# Altium PCB PCB_基于STM32单片机婴儿床自动放音乐自动摇篮_2024-11-12.pcbdoc
Units mil, origin at the board's own origin, x right, y up, seen from the top; angles counter-clockwise.
Board outline 6900 x 6090 mil, 2 copper layers (Top Layer, Bottom Layer); 22 components, 34 nets, 140 pads, 2 vias.
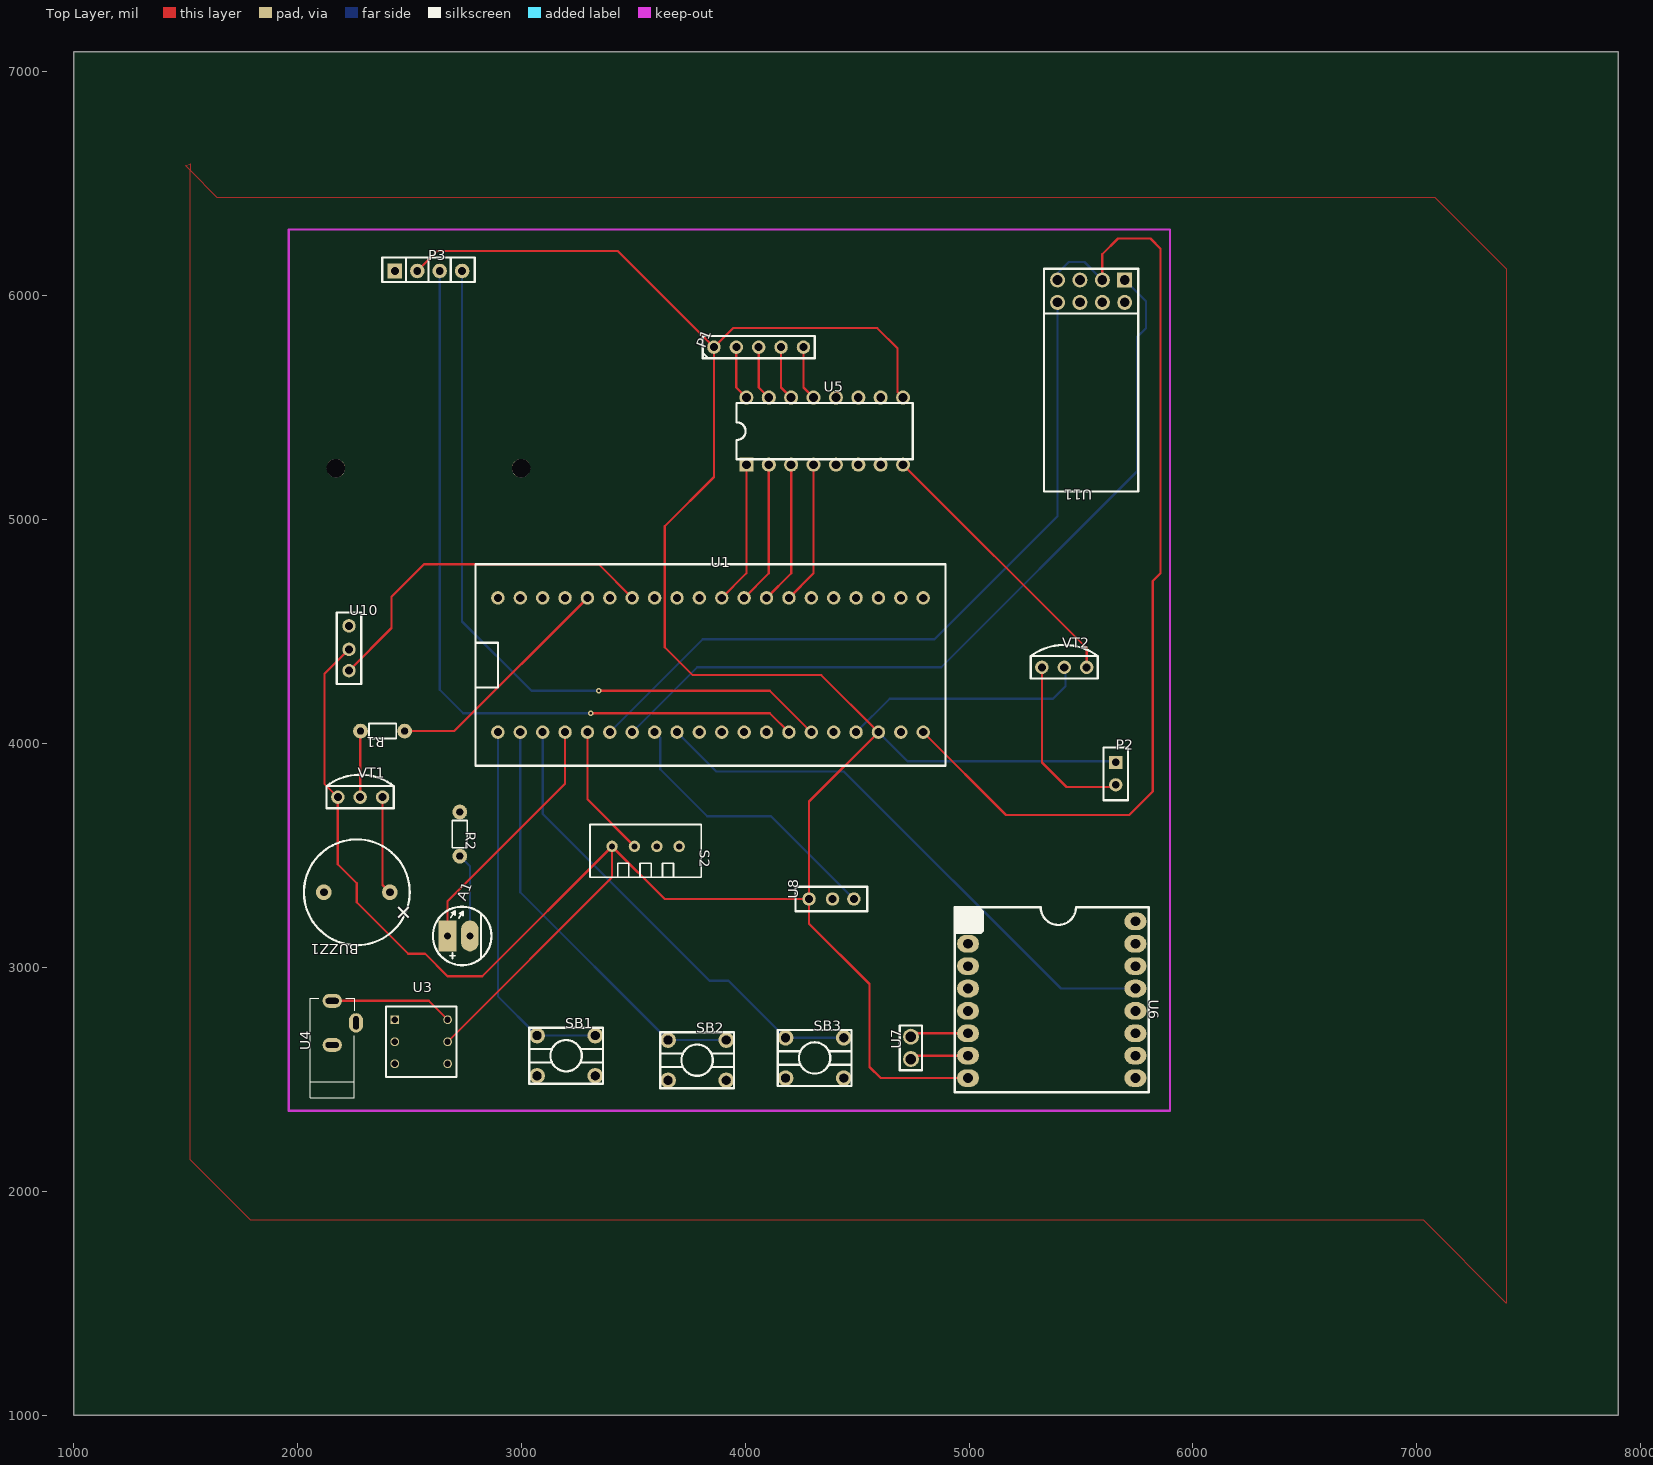
[diagram p0: Top Layer view]
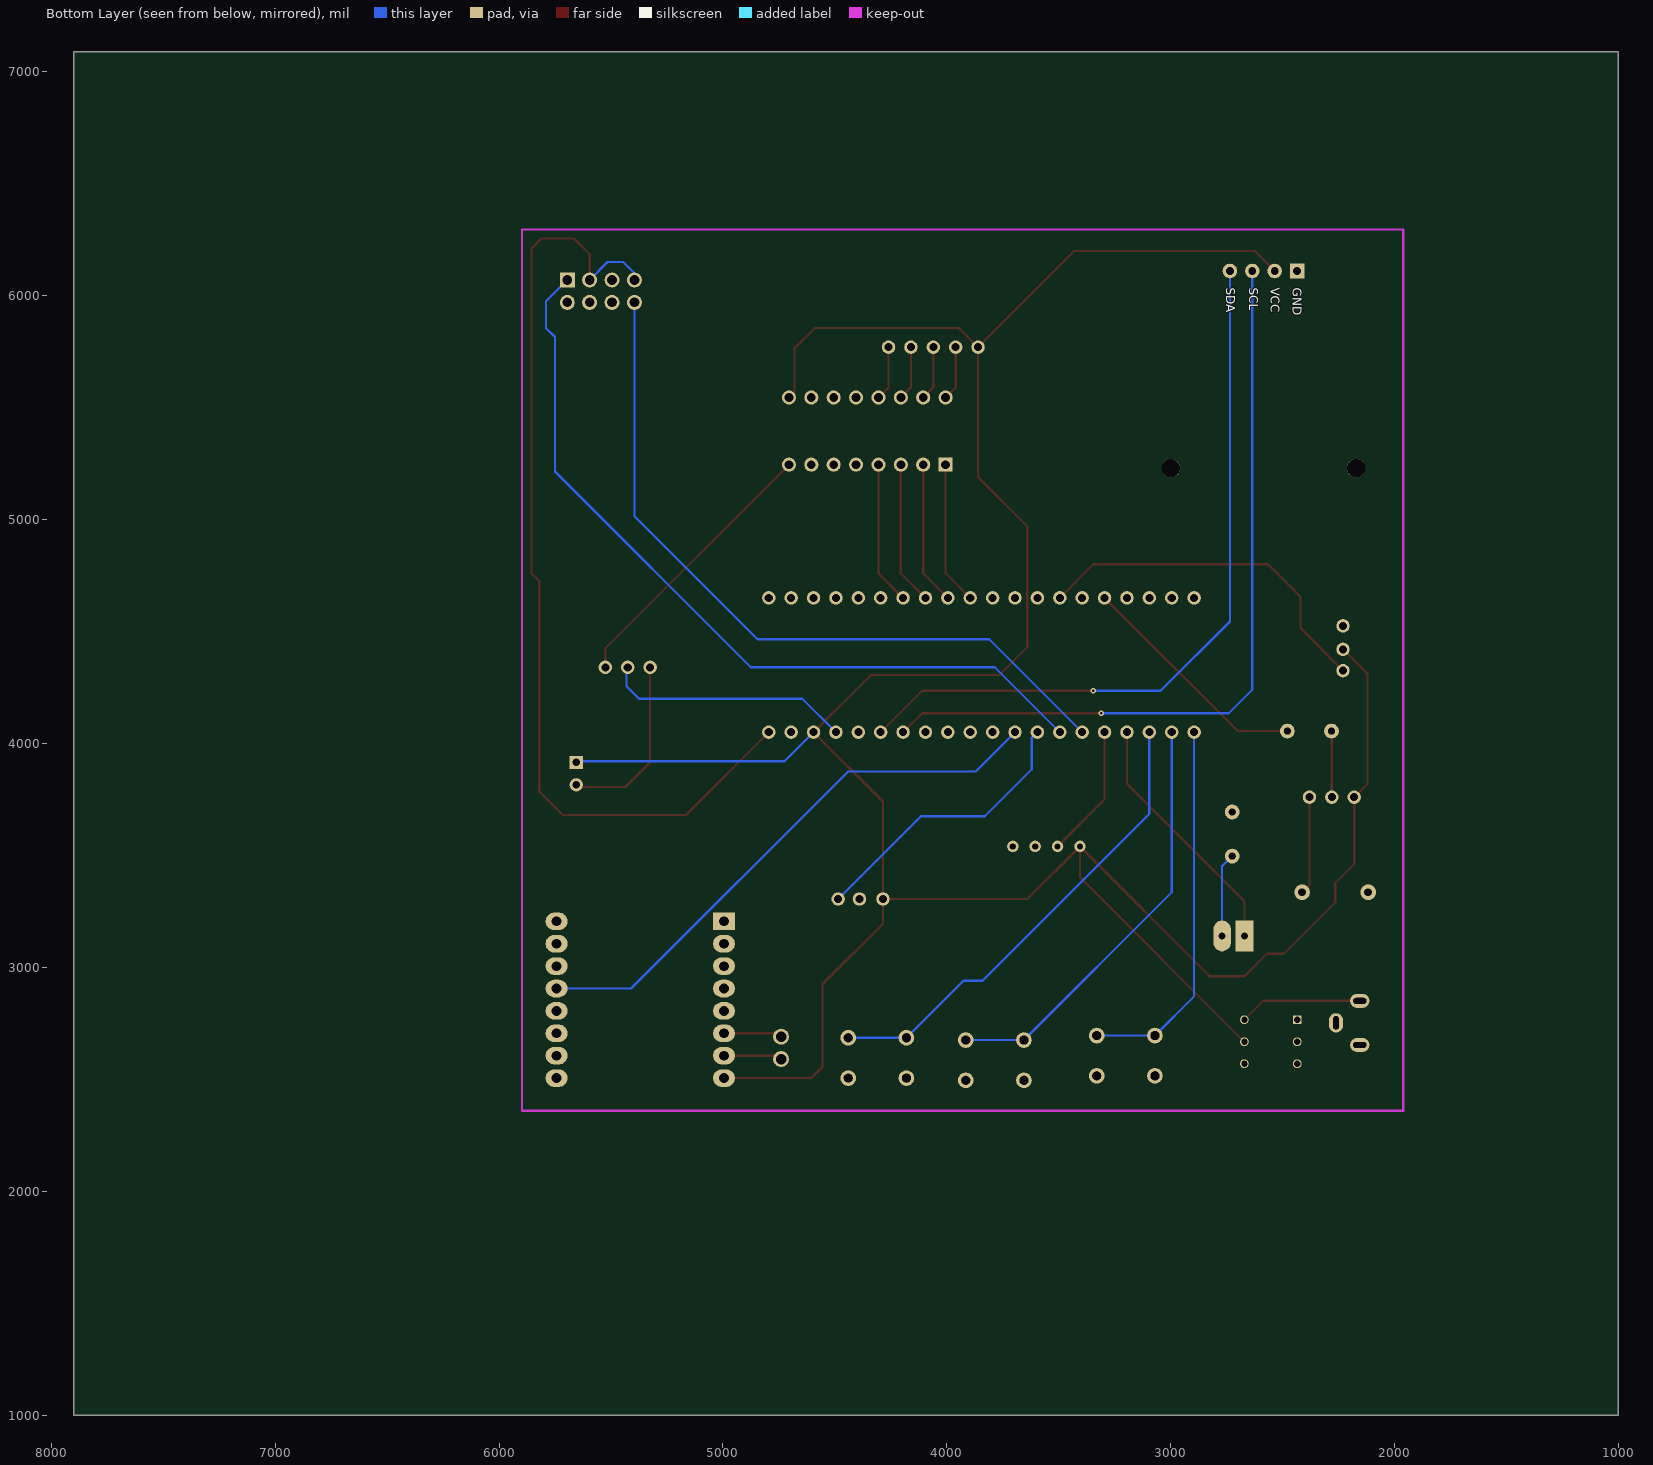
[diagram p1: Bottom Layer view, seen from below]

## Layer stack, top to bottom
Top Layer: signal copper (thickness not stored)
Dielectric: dielectric 12.6, FR-4, Dk 4.8
Bottom Layer: signal copper (thickness not stored)

## Board outline
7900,1000 1000,1000 1000,7090 7900,7090

## Components (designator, comment, footprint, x,y, rotation, side; value= is the part's Value field where it differs from the comment)
A1 "LED灯发光二极5mm" LED灯发光二极5MM 2670,3140 r0 top
BUZZ1 "蜂鸣器BD12.0-P7.50" BUZ-TH_BD12.0-P7.50-D0.6-FD 2265,3335 r180 top
P1 "PIN5" PIN5 4060,5770 r90 top
P2 "2P排针" 2P排针 5655,3915 r0 top
P3 "OLED0.96" 0.96OLED_4P 2585,6170 r0 top
R1 "1k" SPARKFUN-RESISTORS_1/6W-RES 2380,4055 r180 top
R2 "1k" SPARKFUN-RESISTORS_1/6W-RES 2725,3595 r270 top
S2 "DHT11" ? 3400,3545 r270 top
SB1 "按键" 按键 3005,2490 r0 top
SB2 "按键" 按键 3590,2470 r0 top
SB3 "按键" 按键 4115,2480 r0 top
U1 "STM32F103C8T6最小系统板原理图" STM32F103C8T6最小系统板PCB图 3495,4050 r0 top
U3 "自锁开关8*8" 自锁开关8*8 2395,2825 r0 top
U4 "DC3.5插座" DC插座3.5MM 2155,2850 r90 top
U5 "ULN2003N" DIP-16_L19.8-W6.5-P2.54-LS7.6-BL 4355,5395 r0 top
U6 "BY8001-16P" BY8001-16P 4995,3205 r270 top
U7 "排针2" 排针2P 4740,2640 r90 top
U8 "3P排针" 3P排针 4385,3305 r90 top
U10 "3P排针" 3P排针 2230,4425 r0 top
U11 "ESP-01/ESP-01S" WIFI模块8266 5545,6020 r180 top
VT1 "三极管NPN" 三极管NPN 2280,3760 r0 top
VT2 "三极管NPN" 三极管NPN 5425,4340 r0 top

## Footprints (in the part's own frame and the unit in brackets; to place one, negate y for a bottom-side part, rotate by r counter-clockwise, add the part's x,y. Pads: shape width x height; smd on the part's side, far side on the other; paste and mask are expansions set on the pad)
0.96OLED_4P [mm]
  rect 1.65x1.65 hole 0.89 paste+0 mask+0.102: 1(-3.81,-1.52)
  round 1.65 hole 0.89 paste+0 mask+0.102: 2(-1.27,-1.518) 3(1.27,-1.518) 4(3.81,-1.518)
  round 2.1 hole 2.1 unplated paste+0: ""(-10.5,-23.9) ""(10.5,-23.9)
  silkscreen extent -5.25,-2.77 5.25,0
2P排针 [mm]
  rect 1.5x1.5 hole 0.85 paste+0 mask+0.051: 1(0,0)
  round 1.5 hole 0.85 paste+0 mask+0.051: 2(0,-2.54)
  silkscreen extent -1.4,-4.3 1.4,1.7
3P排针 [mil]
  round 60 hole 36 paste+0 mask+2: 1(0,100) 2(0,-5) 3(0,-100)
  silkscreen extent -55,-160 55,160
BUZ-TH_BD12.0-P7.50-D0.6-FD [mil]
  round 70 hole 35.43 paste+0 mask+2: 1(-147.64,0) 2(147.64,0)
  silkscreen extent -236,-236 236,236
BY8001-16P [mm]
  rect 2x2.5 hole 1.1 paste+0 mask+0.051: 1(0,0)
  oval 2x2.5 hole 1.1 paste+0 mask+0.051: 2(2.54,0) 3(5.08,0) 4(7.62,0) 5(10.16,0) 6(12.7,0) 7(15.24,0) 8(17.78,0) 9(17.78,19) 10(15.24,19) 11(12.7,19) 12(10.16,19) 13(7.62,19) 14(5.08,19) 15(2.54,19) 16(0,19)
  silkscreen extent -1.61,-1.5 19.39,20.5
DC插座3.5MM [mm]
  oval 1.6x2.2 hole 0.65 slot 1.5 at 90 deg paste+0 mask+0.102: 1(0,0) 3(-5,0)
  oval 2.2x1.6 hole 0.65 slot 1.5 at 0 deg paste+0 mask+0.102: 2(-2.5,-2.7)
  silkscreen extent -11,-2.5 0.3,2.5
DIP-16_L19.8-W6.5-P2.54-LS7.6-BL [mm]
  rect 1.6x1.6 hole 1 paste+0 mask+0.051: 1(-8.89,-3.81)
  round 1.6 hole 1 paste+0 mask+0.051: 2(-6.35,-3.81) 3(-3.81,-3.81) 4(-1.27,-3.81) 5(1.27,-3.81) 6(3.81,-3.81) 7(6.35,-3.81) 8(8.89,-3.81) 9(8.89,3.81) 10(6.35,3.81) 11(3.81,3.81) 12(1.27,3.81) 13(-1.27,3.81) 14(-3.81,3.81) 15(-6.35,3.81) 16(-8.89,3.81)
  silkscreen extent -10,-3.2 10,3.2
LED灯发光二极5MM [mil]
  rect 78.74x137.79 hole 32 paste+0 mask+4: 1(0,0)
  oval 78.74x137.79 hole 32 paste+0 mask+4: 2(100,0)
  silkscreen extent -65,-131 196,131
PIN5 [mil]
  round 60 hole 36 paste+0 mask+2: 1(0,200) 2(0,100) 3(0,0) 4(0,-100) 5(0,-200)
  silkscreen extent -50,-250 50,250
SPARKFUN-RESISTORS_1/6W-RES [mil]
  round 66 hole 30 slot 30.2 at 0 deg paste+0 mask+2: 1(-98.42,0) 2(98.42,0)
  silkscreen extent -61,-33 61,33
STM32F103C8T6最小系统板PCB图 [mil]
  round 60 hole 36 paste+0 mask+4: 1(-600,600) 2(-500,600) 3(-400,600) 4(-300,600) 5(-200,600) 6(-100,600) 7(0,600) 8(100,600) 9(200,600) 10(300,600) 11(400,600) 12(500,600) 13(600,600) 14(700,600) 15(800,600) 16(900,600) 17(1000,600) 18(1100,600) 19(1200,600) 20(1300,600) 21(1300,0) 22(1200,0) 23(1100,0) 24(1000,0) 25(900,0) 26(800,0) 27(700,0) 28(600,0) 29(500,0) 30(400,0) 31(300,0) 32(200,0) 33(100,0) 34(0,0) 35(-100,0) 36(-200,0) 37(-300,0) 38(-400,0) 39(-500,0) 40(-600,0)
  silkscreen extent -700,-150 1400,750
WIFI模块8266 [mm]
  rect 1.7x1.7 hole 1.1 paste+0 mask+0.102: 1(-3.81,-1.27)
  round 1.7 hole 1.1 paste+0 mask+0.102: 2(-3.81,1.27) 3(-1.27,-1.27) 4(-1.27,1.27) 5(1.27,-1.27) 6(1.27,1.27) 7(3.81,-1.27) 8(3.81,1.27)
  silkscreen extent -5.33,-2.54 5.33,22.73
三极管NPN [mil]
  round 60 hole 36 paste+0 mask+2: 1(-100,0) 2(0,0) 3(100,0)
  silkscreen extent -150,-50 150,100
按键 [mil]
  round 70 hole 39.38 paste+0 mask+2: 1(65,25) 1(325,25) 2(65,205) 2(325,205)
  silkscreen extent 30,-10 360,240
排针2P [mm]
  round 1.8 hole 1.2 paste+0 mask+0.102: 1(-1.27,0) 2(1.27,0)
  silkscreen extent -2.54,-1.27 2.54,1.27
自锁开关8*8 [mm]
  rect 1x1 hole 0.7 paste+0 mask+0.102: 1(1,-1.5)
  round 1 hole 0.7 paste+0 mask+0.102: 2(1,-4) 3(1,-6.5) 4(7,-6.5) 5(7,-4) 6(7,-1.5)
  silkscreen extent 0,-8 8,0
? [mil]
  round 51 hole 28 paste+0 mask+2: 1(5,5) 2(5,105) 3(5,205) 4(5,305)
  silkscreen extent -93,-93 143,403

## Via types
v1: diameter 24, hole 12, Top Layer to Bottom Layer, tented both sides, 2 vias

## Nets (pads, with @x,y where several pads share a name; then routed paths per layer and width w, separated by ;. In a path a pad name is that pad's centre, name@x,y a point inside that pad or via, vN(x,y) a via of type N, cw(c..) or ccw(c..) an arc to the next point about the centre after c; other vN are vias at no path point)
A1_2: A1.2 R2.2 | length 375.2
  Bottom Layer w10: R2.2 2770,3451.58 A1.2
GND: BUZZ1.2 P3.1 R2.1 S2.4 SB1.1 SB2.1 SB3.1 U1.1 U4.2 U4.3 U5.8 U6.14 U8.2 U10.1 U11.2 VT2.3 | length 1244.7
  Top Layer w10: U5.8 5525,4425 VT2.3
P2_2: P2.2 VT2.1 | length 804.7
  Top Layer w10: VT2.1 5325,3915 5435,3805 5645,3805 P2.2
S$22: 
S$37: 
U1_5: R1.1 U1.5 | length 1063
  Top Layer w10: R1.1 2700,4055 U1.5
U1_7: U1.7 U10.3 | length 1605.9
  Top Layer w10: U10.3 2420,4515 2420,4655 2565,4800 3345,4800 U1.7
U1_11: U1.11 U5.1 | length 640.6
  Top Layer w10: U1.11 4005,4760 U5.1
U1_12: U1.12 U5.2 | length 640.6
  Top Layer w10: U1.12 4105,4760 U5.2
U1_13: U1.13 U5.3 | length 640.6
  Top Layer w10: U1.13 4205,4760 U5.3
U1_14: U1.14 U5.4 | length 640.6
  Top Layer w10: U1.14 4305,4760 U5.4
U1_21: U1.21 U11.3 U11.7 | length 4367.7
  Top Layer w10: U1.21 5165,3680 5715,3680 5820,3785 5820,4725 5855,4760 5855,6210 5810,6255 5665,6255 5595,6185 U11.3
  Bottom Layer w10: U11.7 5395,6100 5445,6150 5515,6150 U11.3
U1_24: U1.24 VT2.2 | length 1107
  Bottom Layer w10: U1.24 4645,4200 5375,4200 5430,4255 5430,4335 VT2.2
U1_26: P3.4 U1.26 | length 3330.3
  Top Layer w10: v1(3345,4235) 4110,4235 U1.26
  Bottom Layer w10: P3.4 2735,4545 3045,4235 v1(3345,4235)
U1_27: P3.3 U1.27 | length 3508.9
  Top Layer w10: v1(3310,4135) 4110,4135 U1.27
  Bottom Layer w10: P3.3 2635,4240 2740,4135 v1(3310,4135)
U1_32: U1.32 U6.13 | length 2522.3
  Bottom Layer w10: U1.32 3870,3875 4440,3875 5410,2905 U6.13
U1_33: U1.33 U8.3 | length 1280.6
  Bottom Layer w10: U1.33 3620,4025 3620,3885 3830,3675 4115,3675 U8.3
U1_34: U1.34 U11.1 | length 3648.5
  Bottom Layer w10: U1.34 3785,4340 4875,4340 5750,5215 5750,5815 5790,5855 5790,5975 U11.1
U1_35: U1.35 U11.8 | length 3354.7
  Bottom Layer w10: U1.35 3810,4465 4845,4465 5395,5015 U11.8
U1_36: S2.2 U1.36 | length 597
  Top Layer w10: U1.36 3295,3750 S2.2
U1_37: A1.1 U1.37 | length 1127.5
  Top Layer w10: A1.1 2670,3295 3195,3820 U1.37
U1_38: SB3.2 U1.38 | length 2124.2
  Bottom Layer w10: U1.38 3095,3685 3840,2940 3925,2940 4180,2685 SB3.2@4440,2685
U1_39: SB2.2 U1.39 | length 1908.4
  Bottom Layer w10: U1.39 2995,3335 3655,2675 SB2.2@3915,2675
U1_40: SB1.2 U1.40 | length 1687.5
  Bottom Layer w10: U1.40 2895,2870 3070,2695 SB1.2@3330,2695
U3_6: U3.6 U4.1 | length 550.4
  Top Layer w10: U4.1 2586.53,2850 U3.6
U5_13: P1.5 U5.13 | length 243.6
  Top Layer w10: P1.5 4260,5590 U5.13
U5_14: P1.4 U5.14 | length 243.6
  Top Layer w10: P1.4 4160,5590 U5.14
U5_15: P1.3 U5.15 | length 243.6
  Top Layer w10: P1.3 4060,5590 U5.15
U5_16: P1.2 U5.16 | length 243.6
  Top Layer w10: P1.2 3960,5590 U5.16
U6_6: U6.6 U7.2 | length 261.2
  Top Layer w10: U7.2 4755,2705 U6.6
U6_7: U6.7 U7.1 | length 261.2
  Top Layer w10: U7.1 4755,2605 U6.7
VCC: P1.1 P2.1 P3.2 S2.1 U1.23 U3.5 U5.9 U6.8 U8.1 U10.2 VT1.1 | length 13428
  Top Layer w10: U10.2 2120,4310 2120,3820 VT1.1 2180,3460 2265,3375 2265,3290 2495,3060 2570,3060 2670,2960 2825,2960 S2.1 ; P3.2 2624.75,6200 3430,6200 P1.1 ; U3.5 3405,3401.93 S2.1 ; U5.9 4680,5570 4680,5765 4590,5855 3945,5855 P1.1 ; U6.8 4605,2505 4555,2555 4555,2925 4285,3195 U8.1 ; S2.1 3640,3305 U8.1 ; P1.1 3860,5190 3640,4970 3640,4430 3765,4305 4340,4305 U1.23 4285,3740 U8.1
  Bottom Layer w10: U1.23 4725,3920 5655,3920 P2.1
VT1_2: R1.2 VT1.2 | length 295.7
  Top Layer w10: VT1.2 2280,4053.42 R1.2
VT1_3: BUZZ1.1 VT1.3 | length 438.5
  Top Layer w10: VT1.3 2380,3367.64 BUZZ1.1
pads on no net: P3. S2.3 U1.2 U1.3 U1.4 U1.6 U1.8 U1.9 U1.10 U1.15 U1.16 U1.17 U1.18 U1.19 U1.20 U1.22 U1.25 U1.28 U1.29 U1.30 U1.31 U3.1 U3.2 U3.3 U3.4 U5.5 U5.6 U5.7 U5.10 U5.11 U5.12 U6.1 U6.2 U6.3 U6.4 U6.5 U6.9 U6.10 U6.11 U6.12 U6.15 U6.16 U11.4 U11.5 U11.6

## Polygon pours and split planes (outlines as drawn)
GND on Top Layer (solid): 7400,6120 7400,1500 7030,1870 1790,1870 1520,2140 1520,6560 1640,6440 7080,6440 7400,6120
GND on Top Layer (solid): 1520,6590 1520,6560 1500,6580 1520,6590

## Text inside footprints (layer, text, board x,y; h text height)
BUZZ1: Top Overlay "+" at 2419.16,3252.16 h78.74 r315
P3: Bottom Overlay "GND" at 2453.68,6036.25 h39.37 r90; Bottom Overlay "VCC" at 2553.68,6036.25 h39.37 r90; Bottom Overlay "SCL" at 2647.68,6036.25 h39.37 r90; Bottom Overlay "SDA" at 2750.68,6036.25 h39.37 r90; Document "0.96'OLED" at 2427.7,5771.63 h47.24; Document "IIC-Connector" at 2358.5,5683.13 h47.24